# Altium PCB 24V-20A-Power-Board-v1.0.PcbDoc (part 3 of 4)
Units mil, origin at the board's own origin, x right, y up, seen from the top; angles counter-clockwise.
Board outline 6298 x 5166 mil, 4 copper layers (Top Layer, Layer-1, Layer-2, Bottom Layer), stack 61.653 mil thick; 190 components, 110 nets, 477 pads, 30 vias.
Unrouted connection lines stored in the file: 351.
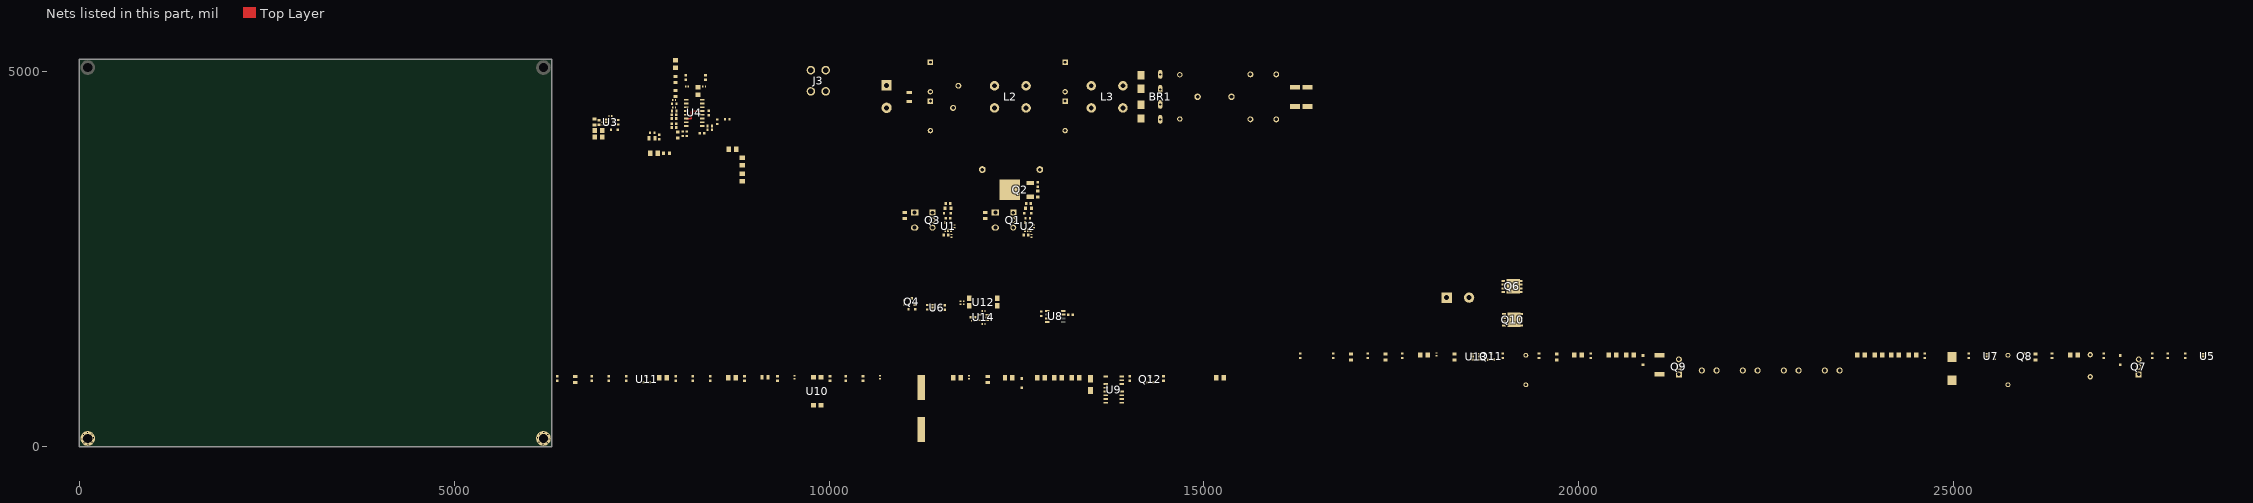
[diagram p2: the nets of this part, all layers, seen from the top]

## Part data (continued)
D1 D5: "DIODE GEN PURP 600V 8A TO220-2", LCSC Part Number=C50428, Manufacturer="ON Semiconductor", ComponentLink1Description=https://datasheet.ciiva.com/14169/zamur840-860-data-e-14169160.pdf?src-supplier=Distrelec, ComponentLink1URL=https://datasheet.ciiva.com/14169/zamur840-860-data-e-14169160.pdf?src-supplier=Distrelec, ComponentLink2Description=https://datasheet.ciiva.com/15144/getdatasheetpartid-103084-15144871.pdf?src-supplier=Verical, ComponentLink2URL=https://datasheet.ciiva.com/15144/getdatasheetpartid-103084-15144871.pdf?src-supplier=Verical, ComponentLink3Description=https://datasheet.ciiva.com/14557/70099562-14557677.pdf?src-supplier=Allied+Electronics, ComponentLink3URL=https://datasheet.ciiva.com/14557/70099562-14557677.pdf?src-supplier=Allied+Electronics, ComponentLink4Description=https://datasheet.ciiva.com/8299/mur820-d-8299771.pdf?src-supplier=Avnet, ComponentLink4URL=https://datasheet.ciiva.com/8299/mur820-d-8299771.pdf?src-supplier=Avnet, ComponentLink5Description=https://datasheet.ciiva.com/916/mur820-d-916462.pdf?src-supplier=Digikey, ComponentLink5URL=https://datasheet.ciiva.com/916/mur820-d-916462.pdf?src-supplier=Digikey, ComponentLink6Description=https://datasheet.ciiva.com/16210/mur820-d-16210191.pdf?src-supplier=Future+Electronics, ComponentLink6URL=https://datasheet.ciiva.com/16210/mur820-d-16210191.pdf?src-supplier=Future+Electronics, Item Type=Diode, Manufacturer Part Number=MUR860G, Pricing="50=0.565, 200=0.54, 750=0.515, 1500=0.505, 3750=0.475 (USD)", RoHS=Yes, Stock=4012, Supplier="Future Electronics"
D2 D6: "30V Independent Type 1V@100mA 200mA SOD-323 Schottky Diodes ROHS", LCSC Part Number=C7422626, Manufacturer=FUXINSEMI, Package=SOD-323, ComponentLink1Description=LCSC, ComponentLink1URL=https://www.lcsc.com/product-detail/Schottky-Diodes_FUXINSEMI-BAT54HT1G_C7422626.html, Item Type=Diode, Manufacturer Part Number=BAT54HT1G
D3 D4: "DIODE GEN PURP 1KV 1A SMB", Average Rectified Current=1A, Case/Package=SMB, Forward Voltage=1.3V, LCSC Part Number=C154864, Manufacturer=Diodes, Max Operating Temperature=150°C, Max Repetitive Reverse Voltage (Vrrm)=1kV, Max Reverse Current=5uA, Max Surge Current=30A, Min Operating Temperature=-65°C, Package Quantity=3000, ComponentLink1Description=https://datasheet.ciiva.com/8301/ds15002-8301721.pdf?src-supplier=Avnet, ComponentLink1URL=https://datasheet.ciiva.com/8301/ds15002-8301721.pdf?src-supplier=Avnet, ComponentLink2Description=https://datasheet.ciiva.com/26818/getdatasheetpartid-91887-26818092.pdf?src-supplier=Verical, ComponentLink2URL=https://datasheet.ciiva.com/26818/getdatasheetpartid-91887-26818092.pdf?src-supplier=Verical, ComponentLink3Description=https://datasheet.ciiva.com/8301/ds15002-8301350.pdf?src-supplier=Avnet, ComponentLink3URL=https://datasheet.ciiva.com/8301/ds15002-8301350.pdf?src-supplier=Avnet, Current Rating=1A, Forward Current=1A, Height=2.42mm, Item Type=Diodes, Lead Free="Lead Free", Length=4.57mm, Manufacturer Part Number=RS1MB-13-F, Max Reverse Voltage (DC)=1kV, Mounting Technology="Surface Mount", Output Current=1A, Packaging="Tape and Reel", Peak Non-Repetitive Surge Current=30A, Pins=2, Polarity=Standard, Pricing="3000=0.0825, 6000=0.093, 9000=0.0794, 12000=0.0905, 15000=0.078, 30000=0.0761, 60000=0.0732 (USD)", Radiation Hardening=No, Recovery Time=500ns, Reverse Recovery Time=500ns, Reverse Recovery Time-Max=500ns, Reverse Voltage (DC)=1kV, RoHS=Yes, RoHS Compliant=Yes, Series=-, Stock=45000, Supplier="Future Electronics", Voltage Rating (DC)=1kV, Weight=0.00328oz, Width=3.94mm
D7: "DIODE ZENER 5.1V 200MW SOD323", Forward Voltage=900mV, LCSC Part Number=C151348, Manufacturer=Diodes, Max Operating Temperature=150°C, Max Power Dissipation=200mW, Max Reverse Current=1uA, Min Operating Temperature=-65°C, Output Current=50mA, Package Quantity=3000, Test Current=5mA, Tolerance=6%, Voltage Rating (DC)=5.1V, ComponentLink1Description=https://datasheet.ciiva.com/15142/getdatasheetpartid-61177-15142295.pdf?src-supplier=Verical, ComponentLink1URL=https://datasheet.ciiva.com/15142/getdatasheetpartid-61177-15142295.pdf?src-supplier=Verical, ComponentLink2Description=https://datasheet.ciiva.com/25623/0900766b8104c1f1-25623741.pdf?src-supplier=Rs, ComponentLink2URL=https://datasheet.ciiva.com/25623/0900766b8104c1f1-25623741.pdf?src-supplier=Rs, Contact Plating=Tin,Matte, ESD Protection=No, Height=1mm, Impedance=60R, Item Type=Diodes, Lead Free="Lead Free", Length=1.8mm, Manufacturer Part Number=BZT52C5V1S-7-F, Max Reverse Leakage Current=1uA, Mounting Technology="Surface Mount", Packaging="Tape and Reel", Pins=2, Power Dissipation=200mW, Power Rating=200mW, Pricing="3000=0.0261, 9000=0.0252, 15000=0.0248, 60000=0.0236, 90000=0.0229 (USD)", Radiation Hardening=No, RoHS=Yes, RoHS Compliant=Yes, Series=-, Stock=30000, Supplier="Future Electronics", Termination=SMD/SMT, Voltage Tolerance=6%, Weight=0.000173oz, Width=1.4mm, Working Voltage=5.1V, Zener Current=5mA, Zener Voltage=5.1V
D8 D9 D11: "DIODE SCHOTTKY 30V 350MA SOD123", LCSC Part Number=C151400, Manufacturer=Diodes, ComponentLink1Description=https://datasheet.ciiva.com/36526/1541925-36526008.pdf?src-supplier=Jameco, ComponentLink1URL=https://datasheet.ciiva.com/36526/1541925-36526008.pdf?src-supplier=Jameco, ComponentLink2Description=https://datasheet.ciiva.com/22695/480042-22695847.pdf?src-supplier=Element14, ComponentLink2URL=https://datasheet.ciiva.com/22695/480042-22695847.pdf?src-supplier=Element14, ComponentLink3Description=https://datasheet.ciiva.com/7964/ds11013-7964329.pdf?src-supplier=Element14, ComponentLink3URL=https://datasheet.ciiva.com/7964/ds11013-7964329.pdf?src-supplier=Element14, ComponentLink4Description=https://datasheet.ciiva.com/912/ds11013-912934.pdf?src-supplier=Digikey, ComponentLink4URL=https://datasheet.ciiva.com/912/ds11013-912934.pdf?src-supplier=Digikey, ComponentLink5Description=https://datasheet.ciiva.com/912/ds11013-912935.pdf?src-supplier=Digikey, ComponentLink5URL=https://datasheet.ciiva.com/912/ds11013-912935.pdf?src-supplier=Digikey, Item Type=Diodes, Manufacturer Part Number=SD103BW-7-F, Pricing="3000=0.0438, 9000=0.0421, 12000=0.0416, 30000=0.0403, 45000=0.039 (USD)", RoHS=Yes, Stock=6000, Supplier="Future Electronics"
D10: "DIODE GEN PURP 600V 1A SMA", LCSC Part Number=C85095, Manufacturer=Diodes, ComponentLink1Description=https://datasheet.ciiva.com/8053/ds16008-8053516.pdf?src-supplier=Element14, ComponentLink1URL=https://datasheet.ciiva.com/8053/ds16008-8053516.pdf?src-supplier=Element14, ComponentLink2Description=https://datasheet.ciiva.com/22695/1906610-22695290.pdf?src-supplier=Element14, ComponentLink2URL=https://datasheet.ciiva.com/22695/1906610-22695290.pdf?src-supplier=Element14, ComponentLink3Description=https://datasheet.ciiva.com/8301/ds16008-8301310.pdf?src-supplier=Avnet, ComponentLink3URL=https://datasheet.ciiva.com/8301/ds16008-8301310.pdf?src-supplier=Avnet, ComponentLink4Description=https://datasheet.ciiva.com/913/ds16008-913197.pdf?src-supplier=Digikey, ComponentLink4URL=https://datasheet.ciiva.com/913/ds16008-913197.pdf?src-supplier=Digikey, ComponentLink5Description=https://datasheet.ciiva.com/913/ds16008-913198.pdf?src-supplier=Digikey, ComponentLink5URL=https://datasheet.ciiva.com/913/ds16008-913198.pdf?src-supplier=Digikey, ComponentLink6Description=https://datasheet.ciiva.com/913/ds16008-913199.pdf?src-supplier=Digikey, ComponentLink6URL=https://datasheet.ciiva.com/913/ds16008-913199.pdf?src-supplier=Digikey, Item Type=Diodes, Manufacturer Part Number=US1J-13-F, Pricing="5000=0.0426, 10000=0.0416, 15000=0.041, 25000=0.0402, 50000=0.0387 (USD)", RoHS=Yes, Stock=840000, Supplier="Future Electronics"
F1: "150A SMD Fuse 10A 32V 1206 Disposable fuses ROHS", LCSC Part Number=C207003, Manufacturer=Littelfuse, Package=1206, ComponentLink1Description=LCSC, ComponentLink1URL=https://www.lcsc.com/product-detail/Disposable-fuses_Littelfuse-0501010-WR1_C207003.html, Item Type=Fuses, Manufacturer Part Number=0501010.WR1
J1 J2: "1x2P Corner With Cover Plate 2 1 7.62mm -40℃~+105℃ 20A 300V Black 12~22 Straight Needle Plugin,P=7.62mm Barrier Terminal Blocks ROHS", LCSC Part Number=C496127, Manufacturer=DORABO, Package=Plugin,P=7.62mm, ComponentLink1Description=LCSC, ComponentLink1URL=https://www.lcsc.com/product-detail/Barrier-Terminal-Blocks_DORABO-DBT50G-7-62-2P-BK-P_C496127.html, Item Type="Terminal Block", Manufacturer Part Number=DBT50G-7.62-2P-BK-P
J3: "M4 Plugin PCB Welding Terminal ROHS", Manufacturer=XFCN, Package=Plugin, ComponentLink1Description=LCSC, Manufacturer Part Number=T44001
L1: library part 7447076, "FIXED IND 150UH 5A 45 MOHM TH", Manufacturer="Wurth Electronics", Supplier Part Number=710-7447076, ComponentLink1Description=https://datasheet.ciiva.com/11796/0900766b804e2e81-11796524.pdf?src-supplier=Rs, ComponentLink1URL=https://datasheet.ciiva.com/11796/0900766b804e2e81-11796524.pdf?src-supplier=Rs, ComponentLink2Description=https://datasheet.ciiva.com/6697/7447076-6697107.pdf?src-supplier=Digikey, ComponentLink2URL=https://datasheet.ciiva.com/6697/7447076-6697107.pdf?src-supplier=Digikey, ComponentLink3Description=https://datasheet.ciiva.com/7695/7447076-7695687.pdf?src-supplier=Element14, ComponentLink3URL=https://datasheet.ciiva.com/7695/7447076-7695687.pdf?src-supplier=Element14, Item Type=Inductors, Manufacturer Part Number=7447076, Pricing="1=5.45, 10=5.19, 50=4.84, 100=4.57, 1000=4.12, 10000=4.12 (USD)", RoHS=Yes, Stock=602, Supplier=Mouser
L2 L3: library part 7448031501, "CMC 1MH 15A 2LN TH", Case/Package=300, Current Rating=15A, Manufacturer="Wurth Electronics", Max Operating Temperature=125°C, Min Operating Temperature=-40°C, Package Quantity=90, Supplier Part Number=710-7448031501, Test Frequency=10kHz, Tolerance=50%, Voltage Rating (AC)=250V, Category="Common Mode Chokes", ComponentLink1Description=https://datasheet.ciiva.com/46423/1832949-46423388.pdf?src-supplier=Element14, ComponentLink1URL=https://datasheet.ciiva.com/46423/1832949-46423388.pdf?src-supplier=Element14, Height=25mm, Item Type=Inductor, Length=23mm, Manufacturer Part Number=7448031501, Max Current Rating=15A, Max DC Current=15A, Mounting Technology="Through Hole", Number of Lines=2, Packaging=Bulk, Pricing="1=12.9, 10=12.9, 50=11.34, 100=9.67, 1000=8.72, 10000=8.72 (USD)", Reach SVHC Compliant=Unknown, RoHS=Yes, RoHS Compliant=Yes, Series=WE-CMBNC, Shielding=Unshielded, Stock=2629, Supplier=Mouser, Termination="Through Hole", Width=17mm
L4: "FIXED IND 300NH 27A 0.29MOHM SMD", Manufacturer=Pulse, Supplier Part Number=673-PA2607.301NLT, ComponentLink1Description=https://datasheet.ciiva.com/15023/+p673-15023974.pdf?src-supplier=Digikey, ComponentLink1URL=https://datasheet.ciiva.com/15023/+p673-15023974.pdf?src-supplier=Digikey, ComponentLink2Description=https://datasheet.ciiva.com/15023/+p673-15023975.pdf?src-supplier=Digikey, ComponentLink2URL=https://datasheet.ciiva.com/15023/+p673-15023975.pdf?src-supplier=Digikey, ComponentLink3Description=https://datasheet.ciiva.com/15023/+p673-15023976.pdf?src-supplier=Digikey, ComponentLink3URL=https://datasheet.ciiva.com/15023/+p673-15023976.pdf?src-supplier=Digikey, ComponentLink4Description=https://datasheet.ciiva.com/8499/+p673-8499369.pdf?src-supplier=Avnet, ComponentLink4URL=https://datasheet.ciiva.com/8499/+p673-8499369.pdf?src-supplier=Avnet, Item Type=Inductor, Manufacturer Part Number=PA2607.301NLT, Pricing="1=1.69, 10=1.19, 50=1.19, 100=0.956, 1000=0.796, 10000=0.795 (USD)", RoHS=Yes, Stock=205, Supplier=Mouser
Q1 Q3 Q7 Q9: "MOSFET N-CH 600V 26A TO220", Drain to Source Breakdown Voltage=600V, Drain to Source Resistance=100mR, Gate to Source Voltage (Vgs)=20V, Manufacturer=Infineon, On-State Resistance=120mR, Package Quantity=500NUMBER, Power Dissipation=28W, Supplier Part Number=726-IPA60R120P7XKSA1, ComponentLink1Description=http://datasheet.octopart.com/IPA60R120P7XKSA1-Infineon-datasheet-96908606.pdf?src-supplier=Future+Electronics, ComponentLink1URL=http://datasheet.octopart.com/IPA60R120P7XKSA1-Infineon-datasheet-96908606.pdf?src-supplier=Future+Electronics, ComponentLink2Description=http://datasheet.octopart.com/IPA60R120P7XKSA1-Infineon-datasheet-96908606.pdf?src-supplier=Digikey, ComponentLink2URL=http://datasheet.octopart.com/IPA60R120P7XKSA1-Infineon-datasheet-96908606.pdf?src-supplier=Digikey, ComponentLink3Description=http://datasheet.octopart.com/IPA60R120P7XKSA1-Infineon-datasheet-96908606.pdf?src-supplier=Farnell, ComponentLink3URL=http://datasheet.octopart.com/IPA60R120P7XKSA1-Infineon-datasheet-96908606.pdf?src-supplier=Farnell, ComponentLink4Description=http://datasheet.octopart.com/IPA60R120P7XKSA1-Infineon-datasheet-96908606.pdf?src-supplier=Newark, ComponentLink4URL=http://datasheet.octopart.com/IPA60R120P7XKSA1-Infineon-datasheet-96908606.pdf?src-supplier=Newark, ComponentLink5Description=http://datasheet.octopart.com/IPA60R120P7XKSA1-Infineon-datasheet-96908606.pdf?src-supplier=Avnet, ComponentLink5URL=http://datasheet.octopart.com/IPA60R120P7XKSA1-Infineon-datasheet-96908606.pdf?src-supplier=Avnet, ComponentLink6Description=http://datasheet.octopart.com/IPA60R120P7XKSA1-Infineon-datasheet-96908606.pdf?src-supplier=Rs, ComponentLink6URL=http://datasheet.octopart.com/IPA60R120P7XKSA1-Infineon-datasheet-96908606.pdf?src-supplier=Rs, ComponentLink7Description=http://datasheet.octopart.com/IPA60R120P7XKSA1-Infineon-datasheet-96908606.pdf?src-supplier=Mouser, ComponentLink7URL=http://datasheet.octopart.com/IPA60R120P7XKSA1-Infineon-datasheet-96908606.pdf?src-supplier=Mouser, ComponentLink8Description=https://datasheet.octopart.com/IPA60R120P7XKSA1-Infineon-datasheet-96908606.pdf?src-supplier=TME, ComponentLink8URL=https://datasheet.octopart.com/IPA60R120P7XKSA1-Infineon-datasheet-96908606.pdf?src-supplier=TME, ComponentLink9Description=http://datasheet.octopart.com/IPA60R120P7XKSA1-Infineon-datasheet-96908606.pdf?src-supplier=Rochester+Electronics, ComponentLink9URL=http://datasheet.octopart.com/IPA60R120P7XKSA1-Infineon-datasheet-96908606.pdf?src-supplier=Rochester+Electronics, Height=18.1mm, Item Type=MOSFETs, Manufacturer Part Number=IPA60R120P7XKSA1, Number of Channels=1NUMBER, Pricing="1=2.99, 10=2.59, 50=2.37, 100=2.03, 1000=1.59, 10000=1.39 (USD)", RoHS=Yes, Stock=2795, Supplier=Mouser, Turn-Off Delay Time=81ns, Turn-On Delay Time=21ns
Q2: "MOSFET N-CH 600V 4A TO252", Case/Package=TO-252-3, Continuous Drain Current (ID)=4A, Drain to Source Voltage (Vdss)=600V, Input Capacitance=263pF, Manufacturer="Alpha & Omega Semiconductor", Max Power Dissipation=56.8W, Package Quantity=1, ComponentLink1Description=https://datasheet.ciiva.com/6367/aod4s60-6367632.pdf?src-supplier=Digikey, ComponentLink1URL=https://datasheet.ciiva.com/6367/aod4s60-6367632.pdf?src-supplier=Digikey, Item Type=Mosfet, Manufacturer Part Number=AOD4S60, Mounting Technology="Surface Mount", Packaging="Cut Tape", Pricing="1=1.32, 10=1.08, 100=0.8399, 500=0.71192, 1000=0.57994 (USD)", Rds On Max=900mR, RoHS=Yes, RoHS Compliant=Yes, Series=aMOS™, Stock=4197, Supplier=Digikey
Q4: "TRANS NPN 80V 0.5A SOT23-3", Current Rating=500mA, Manufacturer=Diodes, Supplier Part Number=2136300, Voltage Rating (DC)=80V, ComponentLink1Description=https://datasheet.ciiva.com/19482/1540800-19482686.pdf?src-supplier=Jameco, ComponentLink1URL=https://datasheet.ciiva.com/19482/1540800-19482686.pdf?src-supplier=Jameco, ComponentLink2Description=https://datasheet.ciiva.com/15139/getdatasheetpartid-116057-15139325.pdf?src-supplier=Verical, ComponentLink2URL=https://datasheet.ciiva.com/15139/getdatasheetpartid-116057-15139325.pdf?src-supplier=Verical, ComponentLink3Description=https://datasheet.ciiva.com/972/ds30037-972971.pdf?src-supplier=Digikey, ComponentLink3URL=https://datasheet.ciiva.com/972/ds30037-972971.pdf?src-supplier=Digikey, ComponentLink4Description=https://datasheet.ciiva.com/972/ds30037-972972.pdf?src-supplier=Digikey, ComponentLink4URL=https://datasheet.ciiva.com/972/ds30037-972972.pdf?src-supplier=Digikey, ComponentLink5Description=https://datasheet.ciiva.com/972/ds30037-972973.pdf?src-supplier=Digikey, ComponentLink5URL=https://datasheet.ciiva.com/972/ds30037-972973.pdf?src-supplier=Digikey, ComponentLink6Description=https://datasheet.ciiva.com/11197/ds30037-11197413.pdf?src-supplier=Avnet, ComponentLink6URL=https://datasheet.ciiva.com/11197/ds30037-11197413.pdf?src-supplier=Avnet, ComponentLink7Description=https://datasheet.ciiva.com/4723/ds30037-4723212.pdf?src-supplier=Mouser, ComponentLink7URL=https://datasheet.ciiva.com/4723/ds30037-4723212.pdf?src-supplier=Mouser, ComponentLink8Description=https://datasheet.ciiva.com/22711/1915521-22711756.pdf?src-supplier=Element14, ComponentLink8URL=https://datasheet.ciiva.com/22711/1915521-22711756.pdf?src-supplier=Element14, ComponentLink9Description=https://datasheet.ciiva.com/16298/ds30037-16298441.pdf?src-supplier=Future+Electronics, ComponentLink9URL=https://datasheet.ciiva.com/16298/ds30037-16298441.pdf?src-supplier=Future+Electronics, Item Type=BJTs, Lead Free=5697LeadFree, Manufacturer Part Number=MMBTA06-7-F, Pricing="3000=0.021, 9000=0.0202, 30000=0.0194, 60000=0.019, 120000=0.0182 (USD)", RoHS=Yes, Stock=573000, Supplier="Future Electronics"
Q5: "DIODE ZENER 15V 300MW SOD323", LCSC Part Number=C454989, Manufacturer=Nexperia, ComponentLink1Description=https://datasheet.octopart.com/BZX384-C15%2C115-Nexperia-datasheet-155662751.pdf?src-supplier=Future+Electronics, ComponentLink1URL=https://datasheet.octopart.com/BZX384-C15%2C115-Nexperia-datasheet-155662751.pdf?src-supplier=Future+Electronics, ComponentLink2Description=https://assets.nexperia.com/documents/data-sheet/BZX384_SERIES.pdf?src-supplier=Digikey, ComponentLink2URL=https://assets.nexperia.com/documents/data-sheet/BZX384_SERIES.pdf?src-supplier=Digikey, ComponentLink3Description=https://datasheet.octopart.com/BZX384-C15%2C115-NXP-Semiconductors-datasheet-10084396.pdf?src-supplier=Element14, ComponentLink3URL=https://datasheet.octopart.com/BZX384-C15%2C115-NXP-Semiconductors-datasheet-10084396.pdf?src-supplier=Element14, ComponentLink4Description=https://datasheet.octopart.com/BZX384-C15%2C115-Nexperia-datasheet-8360268.pdf?src-supplier=Farnell, ComponentLink4URL=https://datasheet.octopart.com/BZX384-C15%2C115-Nexperia-datasheet-8360268.pdf?src-supplier=Farnell, ComponentLink5Description=https://datasheet.octopart.com/BZX384-C15%2C115-Nexperia-datasheet-68321567.pdf?src-supplier=Newark, ComponentLink5URL=https://datasheet.octopart.com/BZX384-C15%2C115-Nexperia-datasheet-68321567.pdf?src-supplier=Newark, ComponentLink6Description=https://datasheet.octopart.com/BZX384-C15%2C115-Nexperia-datasheet-105678879.pdf?src-supplier=TME, ComponentLink6URL=https://datasheet.octopart.com/BZX384-C15%2C115-Nexperia-datasheet-105678879.pdf?src-supplier=TME, Item Type=Diodes, Manufacturer Part Number=BZX384-C15,115, Pins=2NUMBER, Polarity=5054Direction, Pricing="3000=0.0151, 9000=0.0145, 30000=0.014, 60000=0.0137, 120000=0.0131 (USD)", RoHS=Yes, RoHS Compliant=Yes, Stock=1776000, Supplier="Future Electronics"
Q6 Q10: "MOSFET N-CH 80V 100A 8VSON", LCSC Part Number=C2864118, Manufacturer="Texas Instruments", Package="8-VSON-CLIP (5x6)", ComponentLink1Description=LCSC, ComponentLink1URL=https://jlcpcb.com/partdetail/TexasInstruments-CSD19502Q5B/C2864118, Item Type=Mosfet, Manufacturer Part Number=CSD19502Q5B
Q8 Q11: "TRANS PNP 30V 0.1A SOT23-3", LCSC Part Number=C526469, Manufacturer=Diodes, ComponentLink1Description=https://datasheet.ciiva.com/22711/1911718-22711708.pdf?src-supplier=Element14, ComponentLink1URL=https://datasheet.ciiva.com/22711/1911718-22711708.pdf?src-supplier=Element14, ComponentLink2Description=https://datasheet.ciiva.com/11206/ds11207-11206007.pdf?src-supplier=Avnet, ComponentLink2URL=https://datasheet.ciiva.com/11206/ds11207-11206007.pdf?src-supplier=Avnet, Item Type=BJTs, Manufacturer Part Number=BC858C-7-F, Pricing="3000=0.021, 12000=0.0201, 30000=0.0195, 75000=0.0189, 120000=0.0181 (USD)", RoHS=Yes, Stock=69000, Supplier="Future Electronics"
Q12: "TRANS NPN 40V 0.6A SMD SOT23-3", Case/Package=SOT-23, Collector Base Voltage (VCBO)=75V, Collector Emitter Breakdown Voltage=40V, Collector Emitter Saturation Voltage=1V, Continuous Collector Current=600mA, Current=1A, Emitter Base Voltage (VEBO)=6V, Frequency=300MHz, LCSC Part Number=C94515, Manufacturer=Diodes, Max Operating Temperature=150°C, Max Power Dissipation=300mW, Min Operating Temperature=-55°C, Package Quantity=3000, Power Dissipation=350mW, Supplier Part Number 1=MMBT2222A-FDIDKR-ND, Collector Emitter Voltage (VCEO)=40V, ComponentLink1Description=http://www.diodes.com/datasheets/ds30041.pdf?src-supplier=Future+Electronics, ComponentLink1URL=http://www.diodes.com/datasheets/ds30041.pdf?src-supplier=Future+Electronics, ComponentLink2Description=http://www.diodes.com/datasheets/ds30041.pdf?src-supplier=Avnet, ComponentLink2URL=http://www.diodes.com/datasheets/ds30041.pdf?src-supplier=Avnet, ComponentLink3Description=https://www.verical.com/server-webapp/html/getDatasheet?partID=82692&src-supplier=Verical, ComponentLink3URL=https://www.verical.com/server-webapp/html/getDatasheet?partID=82692&src-supplier=Verical, ComponentLink4Description=https://www.diodes.com/assets/Datasheets/ds30041.pdf?src-supplier=Digi-Key, ComponentLink4URL=https://www.diodes.com/assets/Datasheets/ds30041.pdf?src-supplier=Digi-Key, ComponentLink5Description=http://www.diodes.com/datasheets/ds30041.pdf?src-supplier=Avnet+Europe, ComponentLink5URL=http://www.diodes.com/datasheets/ds30041.pdf?src-supplier=Avnet+Europe, ComponentLink6Description=http://www.diodes.com/datasheets/ds30041.pdf?src-supplier=Element14, ComponentLink6URL=http://www.diodes.com/datasheets/ds30041.pdf?src-supplier=Element14, Contact Plating=Matte,Tin, Current Rating=600mA, Element Configuration=Single, Gain Bandwidth Product=300MHz, Height=1mm, hFE Min=100, Item Type=Mosfet, Lead Free="Lead Free", Length=3.05mm, Manufacturer Part Number=MMBT2222A-7-F, Max Breakdown Voltage=40V, Max Collector Current=600mA, Max Frequency=300MHz, Mount="Surface Mount", Number of Elements=1, Number of Pins=3, Packaging="Tape and Reel", Polarity=NPN, Pricing 1="1=0.15, 10=0.134, 100=0.0729, 500=0.04486, 1000=0.03059 (USD)", Radiation Hardening=No, REACH SVHC="No SVHC", Stock 1=2471182, Supplier 1=Digi-Key, Termination=SMD/SMT, Transition Frequency=300MHz, Voltage=40V, Voltage Rating (DC)=40V, Weight=0.000282oz, Width=1.4mm
R1 R5 R10: library part FRC0805F18R2TS, "125mW Thick Film Resistors 150V ±100ppm/℃ ±1% 18.2Ω 0805 Chip Resistor - Surface Mount ROHS", ComponentLink1Description=LCSC
R2 R3: library part PA2512FKE7W0R03E, "RES 0.03 OHM 1% 2W 2512", LCSC Part Number=C728311, Manufacturer=Yageo, Item Type=Resistor, Manufacturer Part Number=PA2512FKE7W0R03E, Pricing="1=0.655, 25=0.542, 50=0.453, 100=0.364, 250=0.314 (USD)", RoHS=No, Stock=4000, Supplier=Avnet
R4 R11 R49 R56 R62 R66 R67 R68 R77: library part RC0603FR-0710KL, "RES SMD 10K Ohm 1% 1/10W 0603", Case Code (Imperial)=0603, Case Code (Metric)=1608, LCSC Part Number=C98220, Manufacturer=Yageo, Max Operating Temperature=155°C, Max Power Dissipation=100mW, Min Operating Temperature=-55°C, Resistance=10kR, Resistance Tolerance=1%, Resistor Type="Thick Film", Supplier Part Number 1=311-10.0KHRCT-ND, Temperature Coefficient=100ppm/°C, Voltage Rating=75V, Voltage Rating (DC)=50V, Case/Package=0603, Category="Chip SMD Resistors", ComponentLink1Description=https://datasheet.ciiva.com/7660/38590-7660789.pdf?src-supplier=Element14, ComponentLink1URL=https://datasheet.ciiva.com/7660/38590-7660789.pdf?src-supplier=Element14, ComponentLink2Description=https://datasheet.ciiva.com/7983/443971-7983596.pdf?src-supplier=Element14, ComponentLink2URL=https://datasheet.ciiva.com/7983/443971-7983596.pdf?src-supplier=Element14, ComponentLink3Description=https://datasheet.ciiva.com/22747/443971-22747519.pdf?src-supplier=Element14, ComponentLink3URL=https://datasheet.ciiva.com/22747/443971-22747519.pdf?src-supplier=Element14, ComponentLink4Description=https://datasheet.ciiva.com/46440/1868787-46440891.pdf?src-supplier=Element14, ComponentLink4URL=https://datasheet.ciiva.com/46440/1868787-46440891.pdf?src-supplier=Element14, ComponentLink5Description=https://datasheet.ciiva.com/7746/1738695-7746239.pdf?src-supplier=Element14, ComponentLink5URL=https://datasheet.ciiva.com/7746/1738695-7746239.pdf?src-supplier=Element14, ComponentLink6Description=https://datasheet.ciiva.com/15189/getdatasheetpartid-409289-15189591.pdf?src-supplier=Verical, ComponentLink6URL=https://datasheet.ciiva.com/15189/getdatasheetpartid-409289-15189591.pdf?src-supplier=Verical, Construction=Rectangular, Depth=0.8mm, Features="Moisture Resistant", Height=0.45mm, Item Type=Resistor, Lead Free="Lead Free", Lead Pitch=0.3mm, Length=1.6mm, Manufacturer Part Number=RC0603FR-0710KL, Military Standard=Not, Number of Pins=2, Number of Terminations=2, Packaging="Tape and Reel", Power Rating=100mW, Pricing 1="1=0.10000, 10=0.02400, 100=0.00970, 1000=0.00436, 2500=0.00378 (USD)", REACH SVHC=Unknown, RoHS=Yes, RoHS Compliant=Yes, Series=RC, Size Code=0603, Stock 1=25249139, Supplier 1=Digi-Key, Termination=SMD/SMT, Tolerance=1%, Weight=7.1E-05oz, Width=0.8mm
R6: library part RC0603FR-0749K9L, "RES 49.9K OHM 1% 1/10W 0603", Case Code (Imperial)=0603, Case Code (Metric)=1608, LCSC Part Number=C114624, Manufacturer=Yageo, Max Operating Temperature=155°C, Max Power Dissipation=100mW, Min Operating Temperature=-55°C, Package Quantity=1, Resistance=49.9kR, Resistor Type="Thick Film", Supplier Part Number 1=311-49.9KHRCT-ND, Temperature Coefficient=100ppm/°C, Tolerance=1%, Voltage Rating=50V, Case/Package=0603, Category="Chip SMD Resistors", ComponentLink1Description=https://datasheet.ciiva.com/2454/pyu-r-int-thick-7-2454042.pdf?src-supplier=Digi-Key, ComponentLink1URL=https://datasheet.ciiva.com/2454/pyu-r-int-thick-7-2454042.pdf?src-supplier=Digi-Key, ComponentLink2Description=https://datasheet.ciiva.com/2454/pyu-r-int-thick-7-2454043.pdf?src-supplier=Digi-Key, ComponentLink2URL=https://datasheet.ciiva.com/2454/pyu-r-int-thick-7-2454043.pdf?src-supplier=Digi-Key, ComponentLink3Description=https://datasheet.ciiva.com/2454/pyu-r-int-thick-7-2454044.pdf?src-supplier=Digi-Key, ComponentLink3URL=https://datasheet.ciiva.com/2454/pyu-r-int-thick-7-2454044.pdf?src-supplier=Digi-Key, ComponentLink4Description=https://datasheet.ciiva.com/15189/getdatasheetpartid-323805-15189749.pdf?src-supplier=Verical, ComponentLink4URL=https://datasheet.ciiva.com/15189/getdatasheetpartid-323805-15189749.pdf?src-supplier=Verical, Construction=Rectangular, Depth=0.8mm, Features="Moisture Resistant", Height=0.022inch, Item Type=Resistor, Lead Free="Lead Free", Length=0.063inch, Manufacturer Part Number=RC0603FR-0749K9L, Military Standard=Not, Mount="Surface Mount", Number of Terminations=2, Packaging="Tape and Reel", Power Rating=100mW, Pricing 1="1=0.10000, 10=0.02400, 100=0.00970, 1000=0.00436, 2500=0.00378 (USD)", RoHS=Yes, RoHS Compliant=Yes, Series=RC, Size Code=0603, Stock 1=77863, Supplier 1=Digi-Key, Termination=SMD/SMT, Voltage Rating (DC)=50V, Width=0.031inch
R7 R9: library part RC0603FR-072R2L, "RES 2.2 OHM 1% 1/10W 0603", Case Code (Imperial)=0603, Case Code (Metric)=1608, LCSC Part Number=C112307, Manufacturer=Yageo, Max Operating Temperature=155°C, Max Power Dissipation=100mW, Min Operating Temperature=-55°C, Package Quantity=1, Resistance Tolerance=1%, Resistor Type="Thick Film", Temperature Coefficient=200ppm/°C, Voltage Rating=50V, Case/Package=0603, ComponentLink1Description=https://datasheet.ciiva.com/11808/0900766b80f96399-11808160.pdf?src-supplier=Rs, ComponentLink1URL=https://datasheet.ciiva.com/11808/0900766b80f96399-11808160.pdf?src-supplier=Rs, ComponentLink2Description=https://datasheet.ciiva.com/2554/pyu-r-int-thick-7-2554421.pdf?src-supplier=Digikey, ComponentLink2URL=https://datasheet.ciiva.com/2554/pyu-r-int-thick-7-2554421.pdf?src-supplier=Digikey, ComponentLink3Description=https://datasheet.ciiva.com/2554/pyu-r-int-thick-7-2554422.pdf?src-supplier=Digikey, ComponentLink3URL=https://datasheet.ciiva.com/2554/pyu-r-int-thick-7-2554422.pdf?src-supplier=Digikey, ComponentLink4Description=https://datasheet.ciiva.com/2554/pyu-r-int-thick-7-2554420.pdf?src-supplier=Digikey, ComponentLink4URL=https://datasheet.ciiva.com/2554/pyu-r-int-thick-7-2554420.pdf?src-supplier=Digikey, Depth=0.8mm, Features="Moisture Resistant", Height=0.022inch, Item Type=Resistors, Lead Free="Lead Free", Length=0.063inch, Manufacturer Part Number=RC0603FR-072R2L, Number of Terminations=2, Packaging="Tape and Reel", Pins=2, Power Rating=100mW, Pricing="1=0.1, 10=0.029, 50=0.0188, 100=0.0158, 500=0.01094, 1000=0.00947 (USD)", Reach SVHC Compliant=No, RoHS=Yes, RoHS Compliant=Yes, Series=RC, Stock=331140, Supplier=Digikey, Technology="THICK FILM", Termination=SMD/SMT, Tolerance=1%, Voltage Rating (DC)=50V, Width=0.031inch
R8 R12: library part CRCW040210R0FKEDHP, "RES SMD 10 OHM 1% 1/5W 0402", Case Code (Imperial)=0402, Case Code (Metric)=1005, LCSC Part Number=C4013850, Manufacturer="Vishay Dale", Max Operating Temperature=155°C, Max Power Dissipation=200mW, Min Operating Temperature=-55°C, Package Quantity=10000, Power Rating=125mW, Resistance Tolerance=1%, Resistor Type="Thick Film", Supplier Part Number 1=541-10.0YCT-ND, Temperature Coefficient=100ppm/°C, Voltage Rating=50V, Case/Package=0402, ComponentLink1Description=http://www.mouser.com/ds/2/427/crcwhpe3-46056.pdf?src-supplier=Mouser, ComponentLink1URL=http://www.mouser.com/ds/2/427/crcwhpe3-46056.pdf?src-supplier=Mouser, Construction=Rectangular, Contact Plating=Tin, Depth=0.5mm, Features="Automotive AEC-Q200", Height=0.3mm, Lead Free="Lead Free", Length=1mm, Manufacturer Part Number=CRCW040210R0FKEDHP, Military Standard=Not, Mount="Surface Mount", Number of Terminations=2, Packaging="Tape and Reel", Pricing 1="1=0.15, 10=0.132, 100=0.0506, 1000=0.02226, 2500=0.01923, 5000=0.0172 (USD)", Radiation Hardening=No, REACH SVHC=Unknown, Resistance=10R, RoHS Compliant=Yes, Series=CRCW-HP, Stock 1=28500, Supplier 1=Digi-Key, Technology="THICK FILM", Termination=SMD/SMT, Tolerance=1%, Voltage Rating (DC)=50V, Weight=2.3E-05oz, Width=0.5mm
R13 R17 R21 R36: library part CR1206F42704G, "250mW 200V ±1% 2.7MΩ 1206 Chip Resistor - Surface Mount ROHS", LCSC Part Number=C3037509, Manufacturer="LIZ Elec", Package=1206, ComponentLink1Description=LCSC, ComponentLink1URL=https://www.lcsc.com/product-detail/Chip-Resistor-Surface-Mount_LIZ-Elec-CR1206F42704G_C3037509.html, Item Type=Resistor, Manufacturer Part Number=CR1206F42704G
R14 R22: library part FRC0603F1652TS, "100mW Thick Film Resistors 75V ±100ppm/℃ ±1% 16.5kΩ 0603 Chip Resistor - Surface Mount ROHS", LCSC Part Number=C2933155, Manufacturer=FOJAN, Package=0603, ComponentLink1Description=LCSC, ComponentLink1URL=https://www.lcsc.com/product-detail/Chip-Resistor-Surface-Mount_FOJAN-FRC0603F1652TS_C2933155.html, Item Type=Resistor, Manufacturer Part Number=FRC0603F1652TS
R15: library part RC1206FR-073M09L, "RES 3.09M OHM 1% 1/4W 1206", Case Code (Imperial)=1206, Case Code (Metric)=3216, LCSC Part Number=C488771, Manufacturer=Yageo, Max Operating Temperature=155°C, Max Power Dissipation=250mW, Min Operating Temperature=-55°C, Package Quantity=1, Temperature Coefficient=100ppm/°C, Tolerance=1%, Voltage Rating (DC)=200V, Case/Package=1206, ComponentLink1Description=https://datasheet.ciiva.com/2461/pyu-rc1206-51-rohs-l-4-2461290.pdf?src-supplier=Digikey, ComponentLink1URL=https://datasheet.ciiva.com/2461/pyu-rc1206-51-rohs-l-4-2461290.pdf?src-supplier=Digikey, ComponentLink2Description=https://datasheet.ciiva.com/2461/pyu-rc1206-51-rohs-l-4-2461291.pdf?src-supplier=Digikey, ComponentLink2URL=https://datasheet.ciiva.com/2461/pyu-rc1206-51-rohs-l-4-2461291.pdf?src-supplier=Digikey, ComponentLink3Description=https://datasheet.ciiva.com/2461/pyu-rc1206-51-rohs-l-4-2461292.pdf?src-supplier=Digikey, ComponentLink3URL=https://datasheet.ciiva.com/2461/pyu-rc1206-51-rohs-l-4-2461292.pdf?src-supplier=Digikey, Contact Plating=Tin,Matte, Features="Moisture Resistant", Height=0.026inch, Item Type=Resistor, Lead Free="Lead Free", Length=0.122inch, Manufacturer Part Number=RC1206FR-073M09L, Number of Terminations=2, Packaging="Cut Tape", Pricing="1=0.1, 10=0.025, 50=0.025, 100=0.015, 1000=0.013, 10000=0.01 (USD)", RoHS=Yes, RoHS Compliant=Yes, Series=RC, Stock=10394, Supplier=Mouser, Width=0.063inch
R16: library part RT0603BRD0710KL, "RES SMD 10K OHM 0.1% 1/10W 0603", Case/Package=0603, LCSC Part Number=C95204, Manufacturer=Yageo, Max Operating Temperature=155°C, Min Operating Temperature=-55°C, Package Height=0.45mm, Package Length=1.6mm, Package Style=SMTMeter, Package Width=0.8mm, Power=100mW, Rated Temperature=70°C, Resistor Type="FIXED RESISTOR", Supplier Part Number 1=1991391P, Temperature Coefficient=25ppm/°C, Tolerance=0.1%, Working Voltage=75V, Category="Chip SMD Resistors", ComponentLink1Description=https://datasheet.ciiva.com:443/pdfs/VipMasterIC/IC/YAGO/YAGO-S-A0008510989/YAGO-S-A0008510989-1.pdf?src-supplier=IHS+Markit, ComponentLink1URL=https://datasheet.ciiva.com:443/pdfs/VipMasterIC/IC/YAGO/YAGO-S-A0008510989/YAGO-S-A0008510989-1.pdf?src-supplier=IHS+Markit, ComponentLink2Description=https://datasheet.ciiva.com/5624/pyu-rt-1-to-0-05-rohs-l-4-5624351.pdf?src-supplier=Mouser, ComponentLink2URL=https://datasheet.ciiva.com/5624/pyu-rt-1-to-0-05-rohs-l-4-5624351.pdf?src-supplier=Mouser, ComponentLink3Description=https://datasheet.ciiva.com/29721/pyu-rt-1-to-0-05-rohs-l-4-29721177.pdf?src-supplier=Digi-Key, ComponentLink3URL=https://datasheet.ciiva.com/29721/pyu-rt-1-to-0-05-rohs-l-4-29721177.pdf?src-supplier=Digi-Key, Construction=Chip, Item Type=Resistor, Manufacturer Part Number=RT0603BRD0710KL, Mounting Technology="Surface Mount", Packaging="Tape and Reel", Pins=2, Pricing 1="100=0.29800, 250=0.27800, 500=0.25900, 1000=0.23700 (GBP)", Reach SVHC Compliant=Yes, RoHS=Yes, RoHS Compliant=Yes, Stock 1=20510, Supplier 1=Rs, Technology="THIN FILM", Termination=Wraparound
R18 R23 R34 R35: library part RC0805FR-072M74L, "RES 2.74M OHM 1% 1/8W 0805", Case Code (Imperial)=0805, Case Code (Metric)=2012, LCSC Part Number=C483055, Manufacturer=Yageo, Max Operating Temperature=155°C, Max Power Dissipation=125mW, Min Operating Temperature=-55°C, Temperature Coefficient=100ppm/°C, Tolerance=1%, Voltage Rating (DC)=150V, Case/Package=0805, ComponentLink1Description=https://datasheet.ciiva.com/2520/pyu-r-int-thick-7-2520626.pdf?src-supplier=Digikey, ComponentLink1URL=https://datasheet.ciiva.com/2520/pyu-r-int-thick-7-2520626.pdf?src-supplier=Digikey, ComponentLink2Description=https://datasheet.ciiva.com/2520/pyu-r-int-thick-7-2520627.pdf?src-supplier=Digikey, ComponentLink2URL=https://datasheet.ciiva.com/2520/pyu-r-int-thick-7-2520627.pdf?src-supplier=Digikey, ComponentLink3Description=https://datasheet.ciiva.com/2520/pyu-r-int-thick-7-2520628.pdf?src-supplier=Digikey, ComponentLink3URL=https://datasheet.ciiva.com/2520/pyu-r-int-thick-7-2520628.pdf?src-supplier=Digikey, Contact Plating=Tin,Matte, Features="Moisture Resistant", Item Type=Resistors, Lead Free="Lead Free", Manufacturer Part Number=RC0805FR-072M74L, Number of Terminations=2, Packaging="Cut Tape", Pricing="1=0.0049, 1000=0.0048 (USD)", RoHS=Yes, RoHS Compliant=Yes, Series=RC, Stock=1449, Supplier="Arrow Electronics"
R19 R20: library part CR1206F511KP05Z, "250mW Thick Film Resistors 200V ±100ppm/℃ ±1% 511kΩ 1206 Chip Resistor - Surface Mount ROHS", LCSC Part Number=C245565, Manufacturer="Ever Ohms Tech", Package=1206, ComponentLink1Description=LCSC, ComponentLink1URL=https://www.lcsc.com/product-detail/Chip-Resistor-Surface-Mount_Ever-Ohms-Tech-CR1206F511KP05Z_C245565.html, Item Type=Resistor, Manufacturer Part Number=CR1206F511KP05Z
R24: library part RC0805FR-0749K9L, "RES 49.9K OHM 1% 1/8W 0805", LCSC Part Number=C114540, Manufacturer=Yageo, Supplier Part Number=3813284, Category="Chip SMD Resistors", ComponentLink1Description=https://datasheet.ciiva.com/11808/0900766b8106beab-11808911.pdf?src-supplier=Rs, ComponentLink1URL=https://datasheet.ciiva.com/11808/0900766b8106beab-11808911.pdf?src-supplier=Rs, ComponentLink2Description=https://datasheet.ciiva.com/12656/rc0805-12656764.pdf?src-supplier=Mouser, ComponentLink2URL=https://datasheet.ciiva.com/12656/rc0805-12656764.pdf?src-supplier=Mouser, ComponentLink3Description=https://datasheet.ciiva.com/2456/pyu-r-int-thick-7-2456990.pdf?src-supplier=Digi-Key, ComponentLink3URL=https://datasheet.ciiva.com/2456/pyu-r-int-thick-7-2456990.pdf?src-supplier=Digi-Key, ComponentLink4Description=https://datasheet.ciiva.com/2456/pyu-r-int-thick-7-2456991.pdf?src-supplier=Digi-Key, ComponentLink4URL=https://datasheet.ciiva.com/2456/pyu-r-int-thick-7-2456991.pdf?src-supplier=Digi-Key, ComponentLink5Description=https://datasheet.ciiva.com/2456/pyu-r-int-thick-7-2456992.pdf?src-supplier=Digi-Key, ComponentLink5URL=https://datasheet.ciiva.com/2456/pyu-r-int-thick-7-2456992.pdf?src-supplier=Digi-Key, Item Type=Resistor, Manufacturer Part Number=RC0805FR-0749K9L, Pricing="5000=0.0041, 25000=0.0025, 50000=0.0038, 125000=0.0024, 200000=0.0036, 500000=0.0023, 625000=0.0035, 1250000=0.0021, 2000000=0.0032 (USD)", RoHS=Yes, Stock=665000, Supplier="Future Electronics"
R25: library part RC0402FR-0795K3L, "RES 95.3K OHM 1% 1/16W 0402", Case Code (Imperial)=0402, Case Code (Metric)=1005, LCSC Part Number=C276280, Manufacturer=Yageo, Max Operating Temperature=155°C, Max Power Dissipation=63mW, Min Operating Temperature=-55°C, Package Quantity=1, Power Rating=62.5mW, Resistance=95.3kR, Resistance Tolerance=1%, Resistor Type="Thick Film", Supplier Part Number 1=8486029, Temperature Coefficient=100ppm/°C, Voltage Rating=50V, Case/Package=0402, Category="Chip SMD Resistors", ComponentLink1Description=https://datasheet.ciiva.com/2453/pyu-r-int-thick-7-2453485.pdf?src-supplier=Digi-Key, ComponentLink1URL=https://datasheet.ciiva.com/2453/pyu-r-int-thick-7-2453485.pdf?src-supplier=Digi-Key, ComponentLink2Description=https://datasheet.ciiva.com/2453/pyu-r-int-thick-7-2453486.pdf?src-supplier=Digi-Key, ComponentLink2URL=https://datasheet.ciiva.com/2453/pyu-r-int-thick-7-2453486.pdf?src-supplier=Digi-Key, ComponentLink3Description=https://datasheet.ciiva.com/2453/pyu-r-int-thick-7-2453484.pdf?src-supplier=Digi-Key, ComponentLink3URL=https://datasheet.ciiva.com/2453/pyu-r-int-thick-7-2453484.pdf?src-supplier=Digi-Key, ComponentLink4Description=https://datasheet.ciiva.com/16746/pyu-rc0402-51-rohs-l-6-r-16746015.pdf?src-supplier=Future+Electronics, ComponentLink4URL=https://datasheet.ciiva.com/16746/pyu-rc0402-51-rohs-l-6-r-16746015.pdf?src-supplier=Future+Electronics, Construction=Rectangular, Contact Plating=Tin,Matte, Depth=0.5mm, Features="Moisture Resistant", Height=0.016inch, Item Type=Resistor, Lead Free="Lead Free", Length=0.039inch, Manufacturer Part Number=RC0402FR-0795K3L, Military Standard=Not, Number of Terminations=2, Packaging="Tape and Reel", Pricing 1="10000=0.00090, 50000=0.00080, 300000=0.00080, 1000000=0.00070, 3000000=0.00070 (USD)", RoHS=Yes, RoHS Compliant=Yes, Series=RC, Size Code=0402, Stock 1=20000, Supplier 1="Future Electronics", Termination=SMD/SMT, Tolerance=1%, Voltage Rating (DC)=50V, Width=0.02inch
R26: library part 0603WAF1333T5E, "100mW Thick Film Resistors 75V ±100ppm/℃ ±1% 133kΩ 0603 Chip Resistor - Surface Mount ROHS", LCSC Part Number=C22870, Manufacturer=UNI-ROYAL, Package=0603, ComponentLink1Description=LCSC, ComponentLink1URL=https://www.lcsc.com/product-detail/Chip-Resistor-Surface-Mount_UNI-ROYAL-Uniroyal-Elec-0603WAF1333T5E_C22870.html, Item Type=Resistor, Manufacturer Part Number=0603WAF1333T5E
R27: library part RT0603BRD077K5L, "RES SMD 7.5K OHM 0.1% 1/10W 0603", Case Code (Imperial)=0603, Case Code (Metric)=1608, LCSC Part Number=C728597, Manufacturer=Yageo, Max Operating Temperature=125°C, Max Power Dissipation=100mW, Min Operating Temperature=-55°C, Package Quantity=5000, Resistance=7.5kR, Resistor Type="Thin Film", Temperature Coefficient=25ppm/°C, Tolerance=0.1%, Voltage Rating=75V, Voltage Rating (DC)=50V, Case/Package=0603, Category="Chip SMD Resistors", ComponentLink1Description=https://datasheet.ciiva.com/8891/pyu-rt-1-to-0-05-rohs-l-4-8891914.pdf?src-supplier=Avnet, ComponentLink1URL=https://datasheet.ciiva.com/8891/pyu-rt-1-to-0-05-rohs-l-4-8891914.pdf?src-supplier=Avnet, Contact Plating=Tin,Matte, Features="Moisture Resistant", Height=0.022inch, Item Type=Resistor, Lead Free="Lead Free", Length=0.063inch, Manufacturer Part Number=RT0603BRD077K5L, Number of Terminations=2, Packaging="Tape and Reel", Power Rating=100mW, Pricing 1="5000=0.02327, 10000=0.02294, 20000=0.02227 (USD)", Radiation Hardening=No, RoHS=Yes, RoHS Compliant=Yes, Series=RT, Size Code=0603, Stock 1=30000, Supplier 1=Avnet, Supplier Part Number 1=RT0603BRD077K5L, Termination=SMD/SMT, Weight=7.1E-05oz, Width=0.8mm
R28: library part CRCW0603100RFKEB, "RES SMD 100 OHM 1% 1/10W 0603", Case Code (Imperial)=0603, Case Code (Metric)=1608, LCSC Part Number=C844513, Max Operating Temperature=155°C, Max Power Dissipation=100mW, Min Operating Temperature=-55°C, Package Quantity=10000, Resistance Tolerance=1%, Resistor Type="Thick Film", Supplier Part Number=71-CRCW0603100RFKEB, Temperature Coefficient=100ppm/°C, Voltage Rating=75V, Case/Package=0603, Category="Chip SMD Resistors", ComponentLink1Description=LCSC, ComponentLink2Description=https://datasheet.ciiva.com/28621/1829286-28621369.pdf?src-supplier=Element14, ComponentLink2URL=https://datasheet.ciiva.com/28621/1829286-28621369.pdf?src-supplier=Element14, ComponentLink3Description=https://datasheet.ciiva.com/5551/dcrcwe3-109170-5551614.pdf?src-supplier=Mouser, ComponentLink3URL=https://datasheet.ciiva.com/5551/dcrcwe3-109170-5551614.pdf?src-supplier=Mouser, ComponentLink4Description=https://datasheet.ciiva.com/3256/dcrcwe3-3256927.pdf?src-supplier=Avnet, ComponentLink4URL=https://datasheet.ciiva.com/3256/dcrcwe3-3256927.pdf?src-supplier=Avnet, ComponentLink5Description=https://datasheet.ciiva.com/16430/dcrcwe3-16430044.pdf?src-supplier=Future+Electronics, ComponentLink5URL=https://datasheet.ciiva.com/16430/dcrcwe3-16430044.pdf?src-supplier=Future+Electronics, Construction=Rectangular, Contact Plating=Tin, Depth=0.85mm, Features="Automotive AEC-Q200", Height=0.02inch, Item Type=Resistor, Lead Free="Lead Free", Length=1.55mm, Military Standard=Not, Number of Terminations=2, Packaging="Tape and Reel", Power Rating=100mW, Pricing="1=0.1, 10=0.017, 50=0.017, 100=0.01, 1000=0.008, 10000=0.004 (USD)", Radiation Hardening=No, Reach SVHC Compliant=Unknown, RoHS=Yes, RoHS Compliant=Yes, Series=CRCW, Stock=43446, Supplier=Mouser, Termination=SMD/SMT, Tolerance=1%, Voltage Rating (DC)=75V, Weight=7.1E-05oz, Width=0.85mm
R29 R30 R31 R33: library part FRC0603F6652TS, "100mW Thick Film Resistors 75V ±100ppm/℃ ±1% 66.5kΩ 0603 Chip Resistor - Surface Mount ROHS", LCSC Part Number=C2933250, Manufacturer=FOJAN, Package=0603, ComponentLink1Description=LCSC, ComponentLink1URL=https://www.lcsc.com/product-detail/Chip-Resistor-Surface-Mount_FOJAN-FRC0603F6652TS_C2933250.html, Item Type=Resistor, Manufacturer Part Number=FRC0603F6652TS
R32: library part AC0603FR-07124KL, "RES SMD 124K OHM 1% 1/10W 0603", LCSC Part Number=C227568, Manufacturer=Yageo, Supplier Part Number=603-AC0603FR-07124KL, Category="Chip SMD Resistors", ComponentLink1Description=http://www.mouser.com/ds/2/447/yageodocoutput-1111992.pdf?src-supplier=Mouser, ComponentLink1URL=http://www.mouser.com/ds/2/447/yageodocoutput-1111992.pdf?src-supplier=Mouser, ComponentLink2Description=http://www.yageo.com/NewPortal/yageodocoutput?fileName=/pdf/R-Chip/PYu-AC_51_RoHS_L_6.pdf&src-supplier=Digi-Key, ComponentLink2URL=http://www.yageo.com/NewPortal/yageodocoutput?fileName=/pdf/R-Chip/PYu-AC_51_RoHS_L_6.pdf&src-supplier=Digi-Key, Item Type=Resistor, Manufacturer Part Number=AC0603FR-07124KL, Pricing="1=0.1, 10=0.013, 50=0.013, 100=0.007, 1000=0.006, 10000=0.003 (USD)", RoHS=Yes, Stock=7297, Supplier=Mouser
R37: library part RC0603FR-0782K5L, "RES 82.5K OHM 1% 1/10W 0603", LCSC Part Number=C185310, Manufacturer=Yageo, Voltage Rating (DC)=50V, ComponentLink1Description=https://datasheet.ciiva.com/2519/pyu-r-int-thick-7-2519111.pdf?src-supplier=Digikey, ComponentLink1URL=https://datasheet.ciiva.com/2519/pyu-r-int-thick-7-2519111.pdf?src-supplier=Digikey, ComponentLink2Description=https://datasheet.ciiva.com/2519/pyu-r-int-thick-7-2519112.pdf?src-supplier=Digikey, ComponentLink2URL=https://datasheet.ciiva.com/2519/pyu-r-int-thick-7-2519112.pdf?src-supplier=Digikey, ComponentLink3Description=https://datasheet.ciiva.com/2519/pyu-r-int-thick-7-2519113.pdf?src-supplier=Digikey, ComponentLink3URL=https://datasheet.ciiva.com/2519/pyu-r-int-thick-7-2519113.pdf?src-supplier=Digikey, Item Type=Resistor, Lead Free=5697LeadFree, Manufacturer Part Number=RC0603FR-0782K5L, Pricing="5000=0.00112 (USD)", RoHS=Yes, Stock=165000, Supplier=Avnet
R38: library part RT0603BRE076K8L, "RES SMD 6.8K OHM 0.1% 1/10W 0603", Case/Package=0603, LCSC Part Number=C705876, Manufacturer=Yageo, Max Operating Temperature=155°C, Min Operating Temperature=-55°C, Package Height=0.45mm, Package Length=1.6mm, Package Style=SMTMeter, Package Width=0.8mm, Power=100mW, Rated Temperature=70°C, Resistor Type="FIXED RESISTOR", Supplier Part Number 1=603-RT0603BRE076K8L, Temperature Coefficient=50ppm/°C, Tolerance=0.1%, Working Voltage=75V, Category="Chip SMD Resistors", ComponentLink1Description=https://datasheet.ciiva.com:443/pdfs/VipMasterIC/IC/YAGO/YAGO-S-A0008510989/YAGO-S-A0008510989-1.pdf?src-supplier=IHS+Markit, ComponentLink1URL=https://datasheet.ciiva.com:443/pdfs/VipMasterIC/IC/YAGO/YAGO-S-A0008510989/YAGO-S-A0008510989-1.pdf?src-supplier=IHS+Markit, ComponentLink2Description=https://datasheet.ciiva.com/2584/pyu-rt-1-to-0-05-rohs-l-5-2584607.pdf?src-supplier=Digi-Key, ComponentLink2URL=https://datasheet.ciiva.com/2584/pyu-rt-1-to-0-05-rohs-l-5-2584607.pdf?src-supplier=Digi-Key, Construction=Chip, Item Type=Resistor, Manufacturer Part Number=RT0603BRE076K8L, Mounting Technology="Surface Mount", Packaging="Tape and Reel", Pins=2, Pricing 1="1=0.32000, 10=0.26800, 50=0.26800, 100=0.10500, 1000=0.04400, 10000=0.03600 (USD)", Reach SVHC Compliant=Yes, RoHS=Yes, RoHS Compliant=Yes, Stock 1=1191, Supplier 1=Mouser, Technology="THIN FILM", Termination=Wraparound
R39 R50: library part RC0603FR-074R7L, "RES 4.7 OHM 1% 1/10W 0603", Case Code (Imperial)=0603, Case Code (Metric)=1608, LCSC Part Number=C137705, Manufacturer=Yageo, Max Operating Temperature=155°C, Max Power Dissipation=100mW, Min Operating Temperature=-55°C, Package Quantity=5000, Resistance Tolerance=1%, Resistor Type="Thick Film", Supplier Part Number 1=3598901, Temperature Coefficient=200ppm/°C, Voltage Rating=50V, Case/Package=0603, Category="Chip SMD Resistors", ComponentLink1Description=https://datasheet.ciiva.com/46440/1868787-46440910.pdf?src-supplier=Element14, ComponentLink1URL=https://datasheet.ciiva.com/46440/1868787-46440910.pdf?src-supplier=Element14, ComponentLink2Description=https://datasheet.ciiva.com/12555/rc0603-272842-12555071.pdf?src-supplier=Mouser, ComponentLink2URL=https://datasheet.ciiva.com/12555/rc0603-272842-12555071.pdf?src-supplier=Mouser, Features="Moisture Resistant", Height=0.45mm, Item Type=Resistor, Lead Free="Lead Free", Length=1.6mm, Manufacturer Part Number=RC0603FR-074R7L, Number of Terminations=2, Packaging="Tape and Reel", Pins=2, Power Rating=100mW, Pricing 1="5000=0.0036, 25000=0.0034, 125000=0.0032, 250000=0.0031, 750000=0.0029 (USD)", Reach SVHC Compliant=Unknown, RoHS=Yes, Series=RC, Stock 1=160000, Supplier 1="Future Electronics", Termination=SMD/SMT, Tolerance=1%, Voltage Rating (DC)=50V, Width=0.8mm